# Allegro board 980K2-260817_261112-1.brd
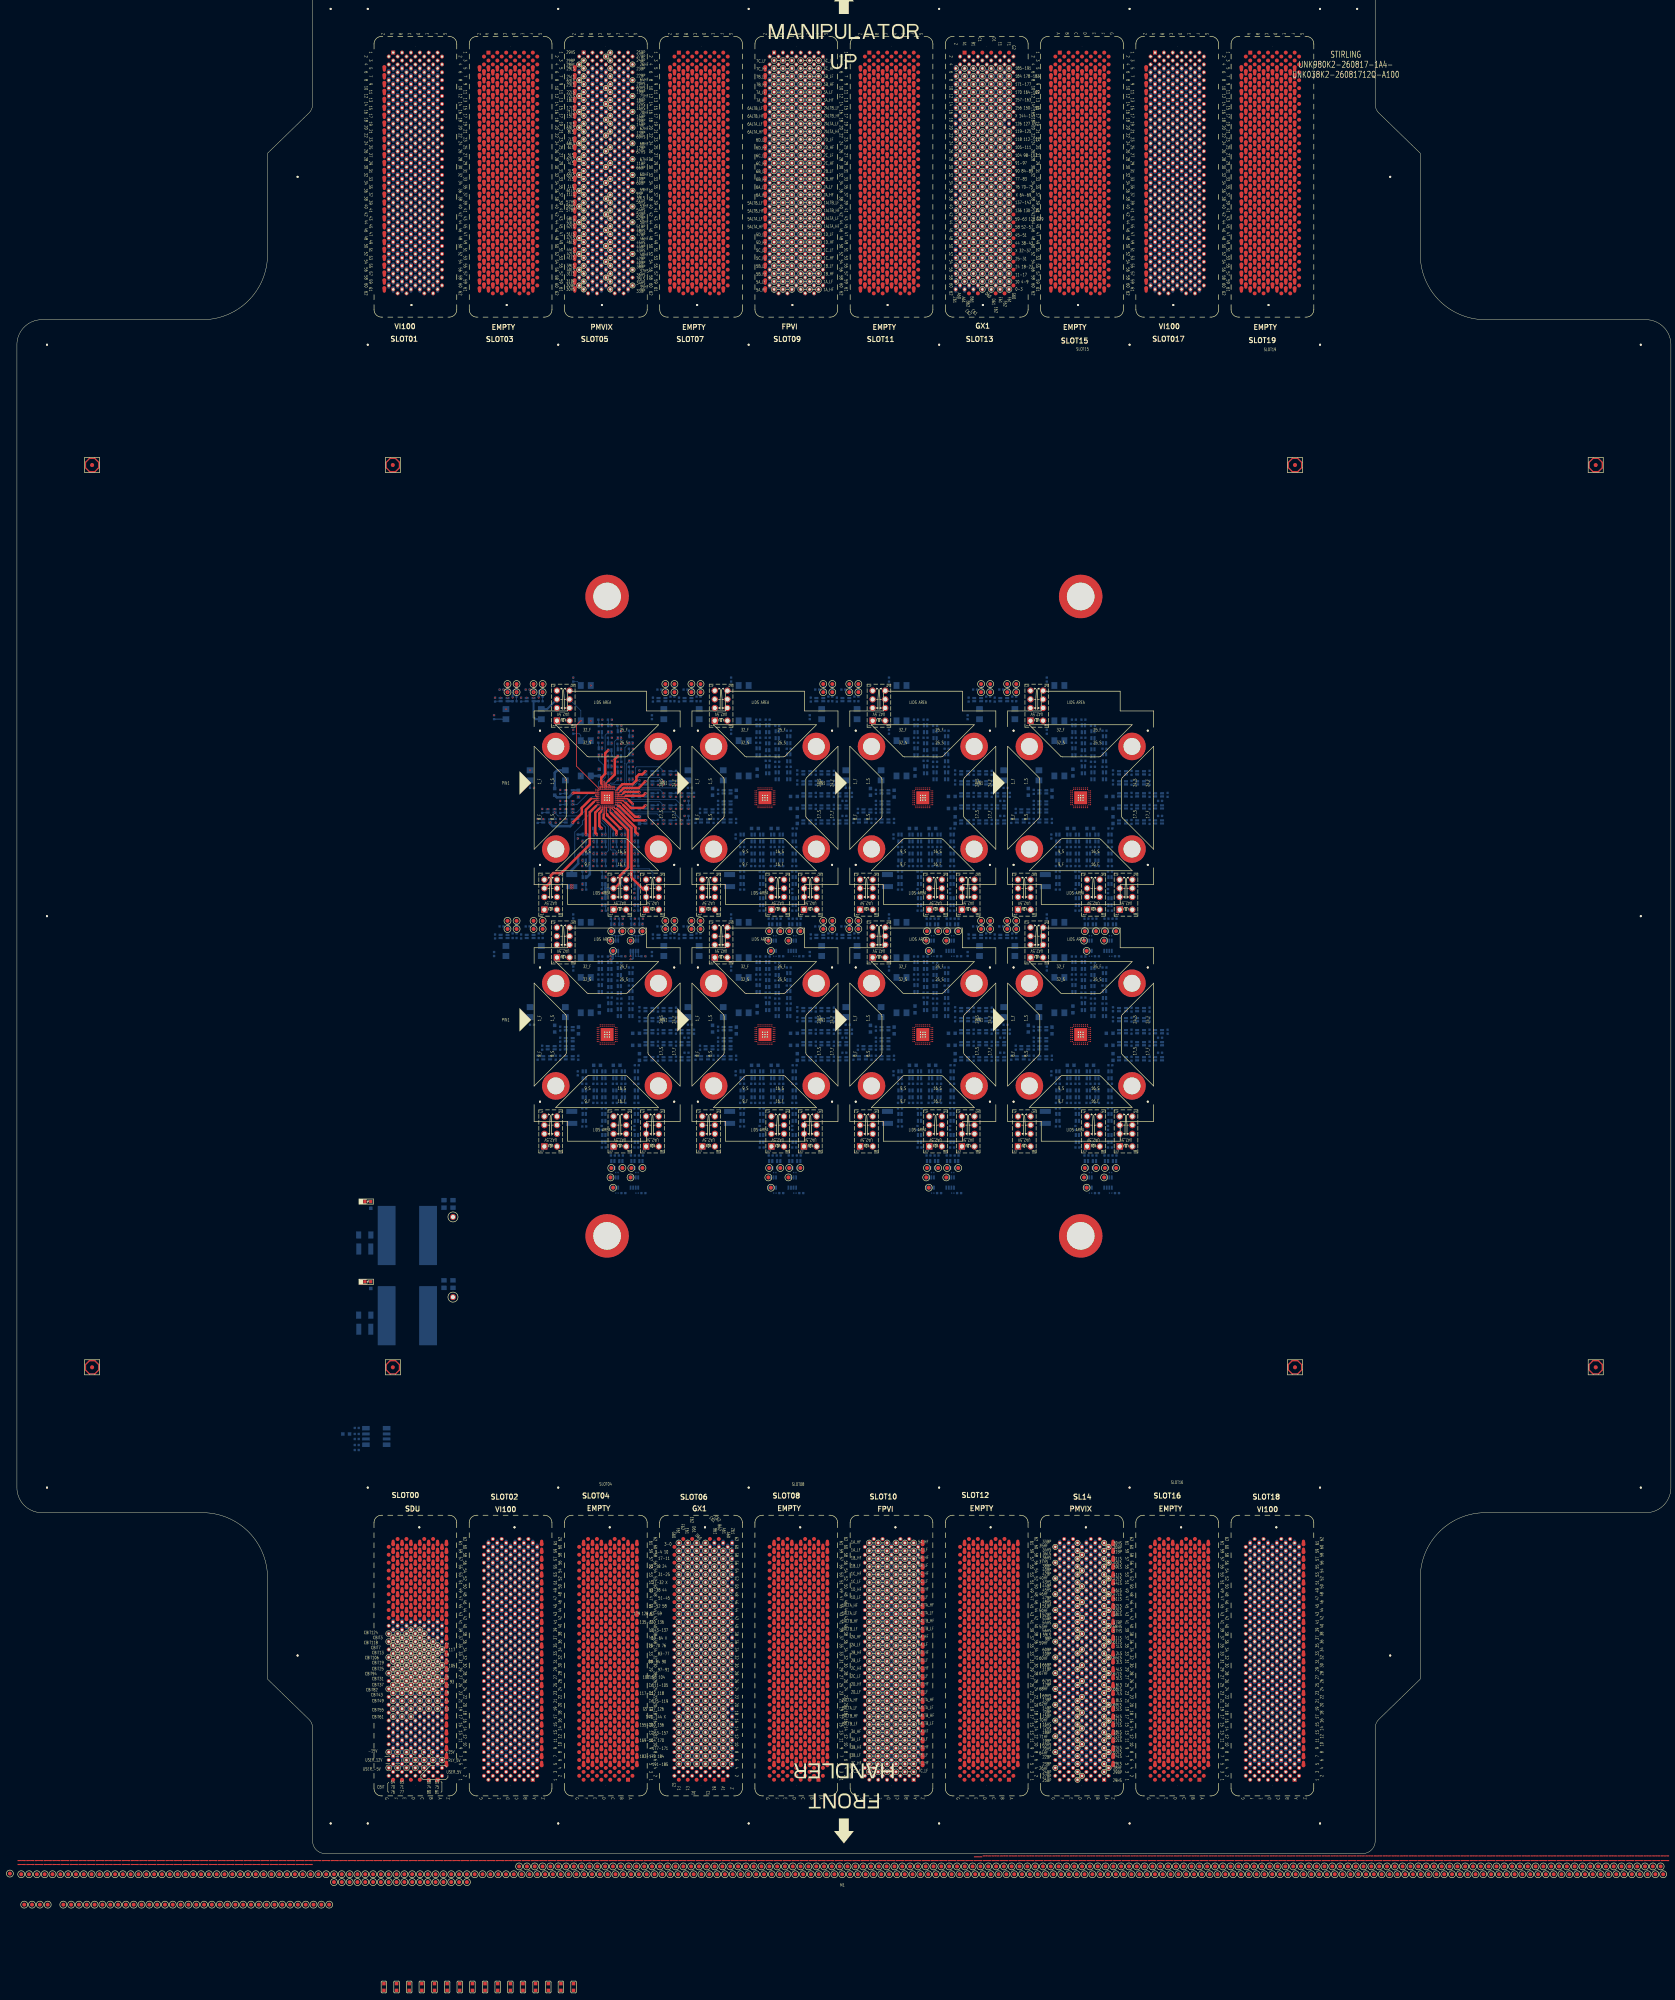
[diagram p0: board, top side]
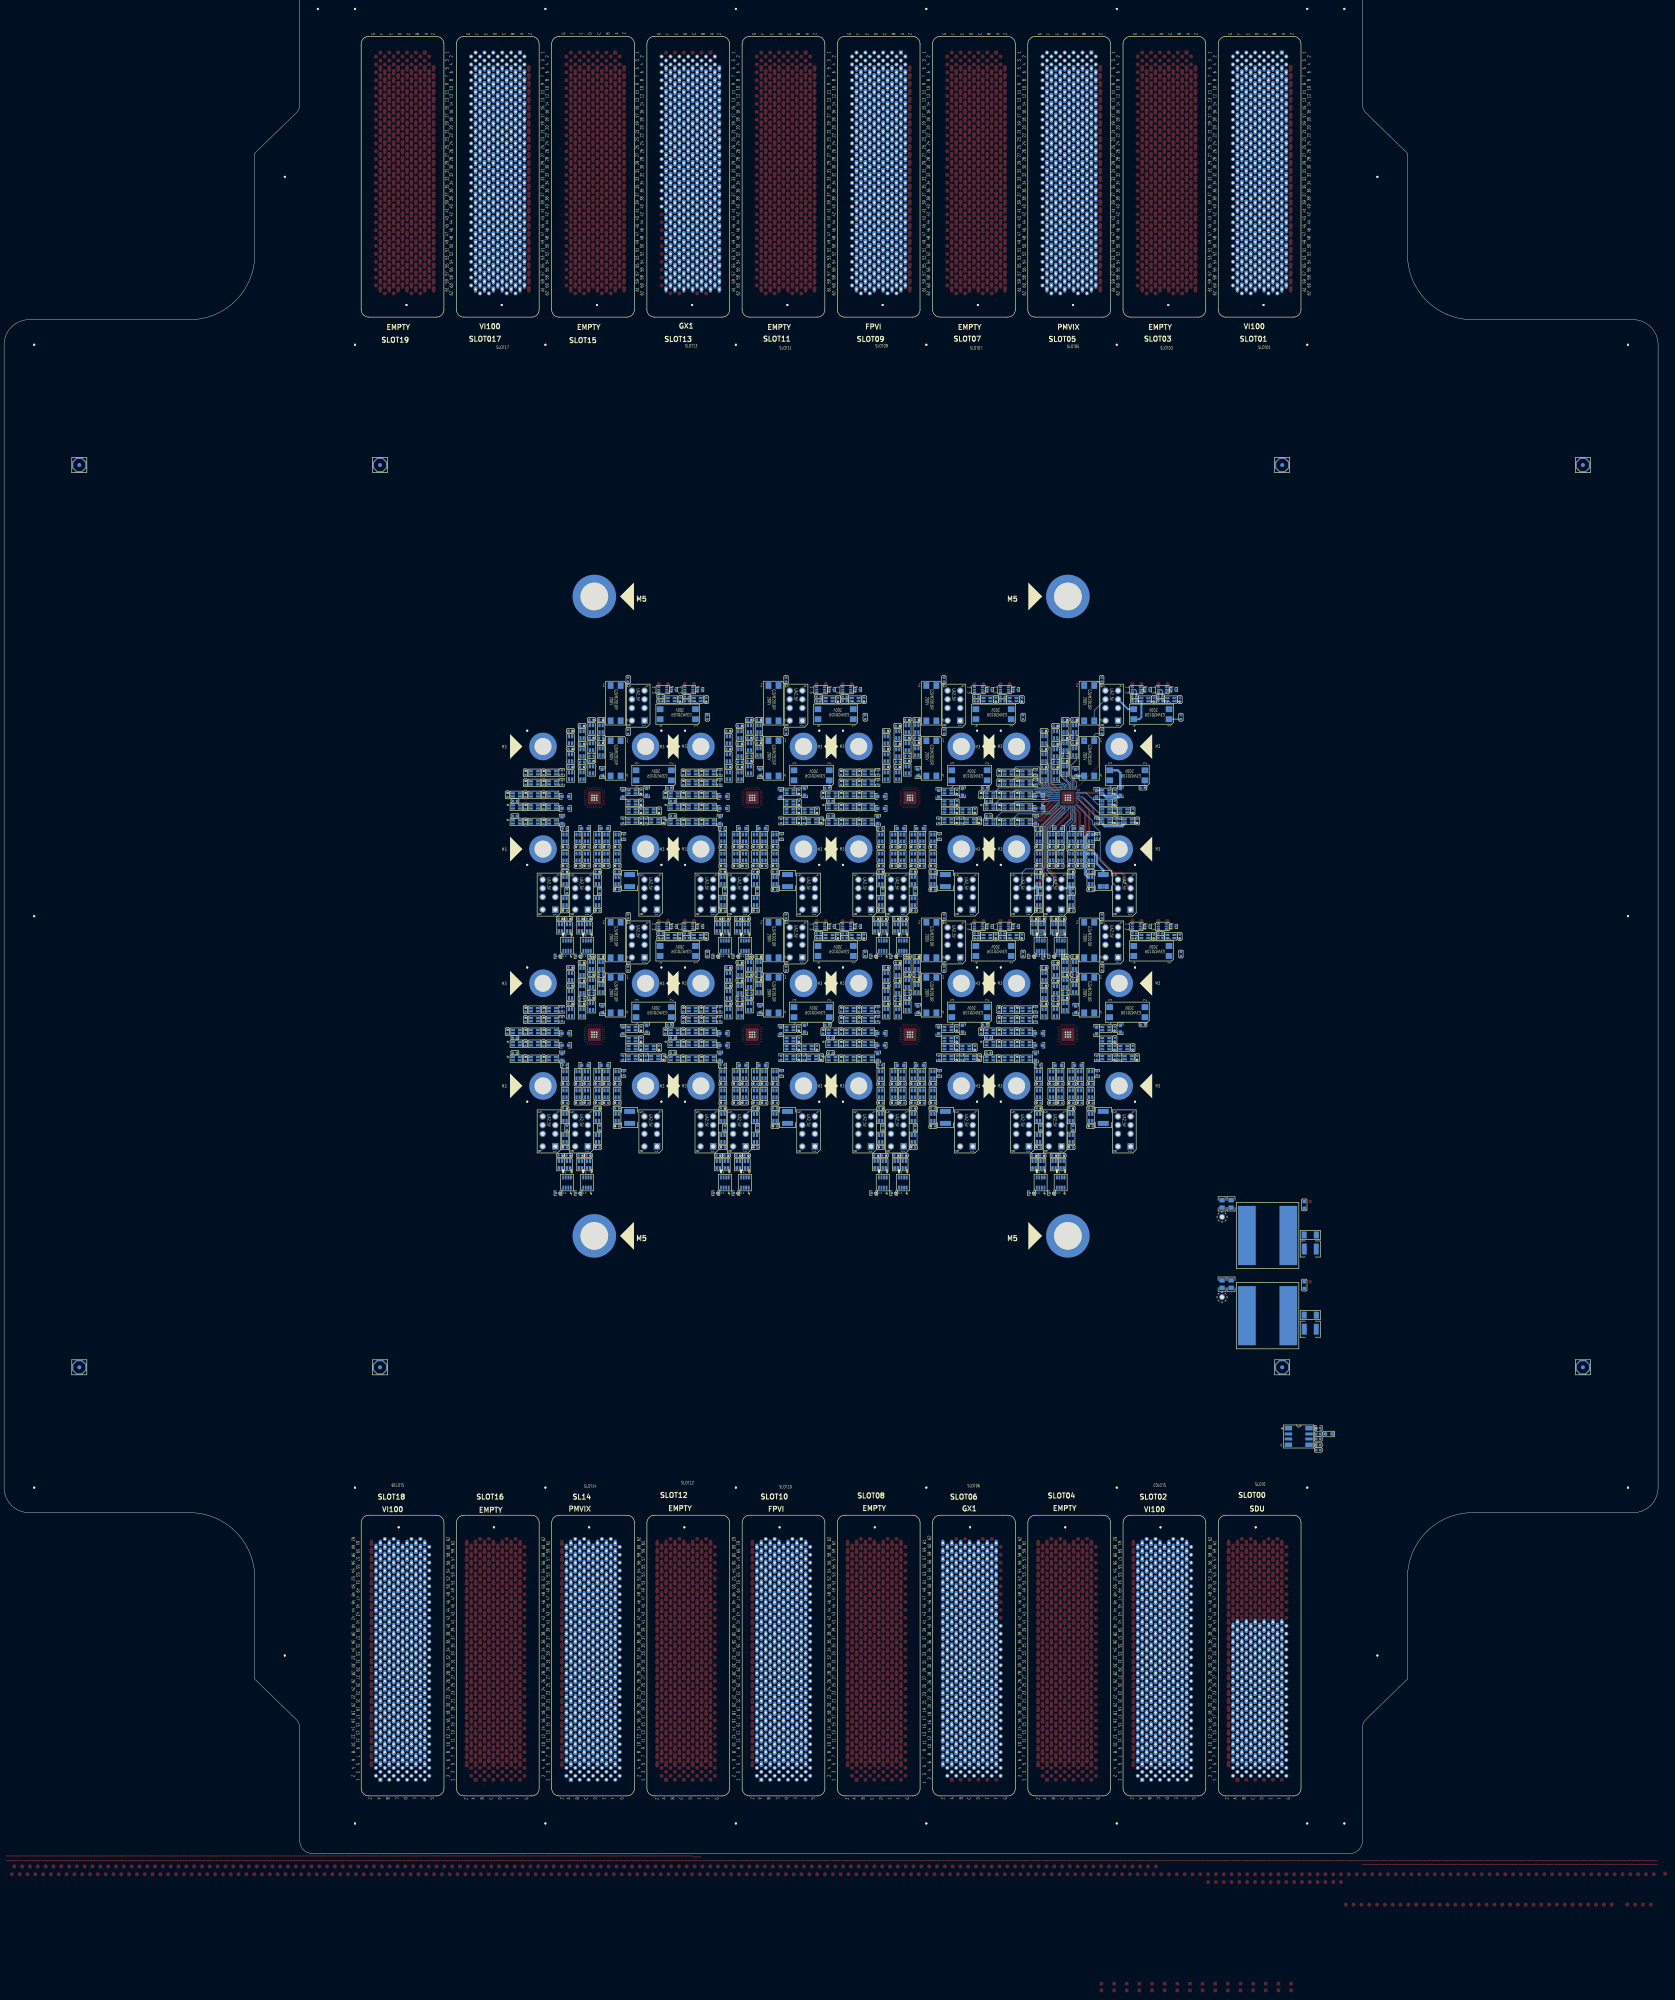
[diagram p1: board, bottom side, seen from below]

Outline 419.1 x 474.98 mm; copper layers: TOP, L02_GND, L03_DP, L04_GND, L05_DP, L06_GND, L07_VI, L08_GND, L09_VI, L10_GND, L11_VI, L12_GND, L13_VI, L14_GND, L15_5V, L16_5V, L17_C-BIT, L18_C-BIT, L19_GND, L20_VI, L21_GND, L22_VI, L23_GND, L24_VI, L25_GND, L26_VI, L27_GND, L28_DP, L29_GND, L30_DP, L31_GND, BOTTOM. Coordinates in mm from the lower left corner of the outline.

## Placement (name value [footprint] x y rotation side)
BC9  0.1U-50-X-S4-TDK  [C0402]  86.11 107.82 180 bottom
BR5  1K-1-S4  [R0402]  86.11 106.3 0 bottom
BR6  1K-1-S4  [R0402]  86.11 103.5 0 bottom
BR7  0-5-S6  [R0603]  83.44 106.3 180 bottom
BR8  0-5-S4  [R0402]  86.11 105.03 180 bottom
BR9  0-5-S4  [R0402]  86.11 102.24 180 bottom
BU1  AT24C512C-SSHM-T-SOIC8  [SO8_206X127MM]  91.06 105.66 180 bottom
C48  0.01U-100-X7R-S6-MU  [C0603]  147.57 273.87 90 bottom
C49  0.01U-100-X7R-S6-MU  [C0603]  136.27 268.99 270 bottom
C50  0.01U-100-X7R-S6-MU  [C0603]  142.28 268.54 270 bottom
C53  1U-16-X5R-S4-YA  [C0402]  142.24 261.62 270 bottom
C54  2.2U-16-X-S4-MU  [C0402]  136.53 261.62 270 bottom
C58  1U-16-X5R-S4-YA  [C0402]  142.11 257.68 270 bottom
C59  4.7U-100-X-SB-MU  [C1210]  140.59 246.51 270 bottom
C60  0.01U-100-X7R-S6-MU  [C0603]  147.01 259.72 0 bottom
C61  0.01U-100-X7R-S6-MU  [C0603]  156.88 264.78 180 bottom
C62  2.2U-16-X-S4-MU  [C0402]  157.07 259.72 0 bottom
C63  0.01U-100-X7R-S6-MU  [C0603]  157.73 261.82 90 bottom
C64  0.01U-100-X7R-S6-MU  [C0603]  156.88 267.82 180 bottom
C65  0.1U-25-X7R-S4-MU  [C0402]  157.73 271.37 90 bottom
C66  0.1U-25-X7R-S4-MU  [C0402]  152.65 276.61 180 bottom
C67  0.1U-25-X7R-S4-MU  [C0402]  150.24 278.13 180 bottom
C68  0.1U-25-X7R-S4-MU  [C0402]  147.83 282.7 180 bottom
C69  0.01U-100-X7R-S6-MU  [C0603]  151.96 259.72 0 bottom
C70  0.1U-25-X7R-S4-MU  [C0402]  122.8 294.89 180 bottom
C71  0.1U-25-X7R-S4-MU  [C0402]  129.42 294.89 180 bottom
C72  0.1U-25-X7R-S4-MU  [C0402]  158.75 227.33 0 bottom
C73  0.1U-25-X7R-S4-MU  [C0402]  153.67 227.33 0 bottom
C74  0.1U-25-X7R-S4-MU  [C0402]  157.73 273.91 90 bottom
CT1  47U-16-X5R-SB-MU  [C1210]  88.14 153.16 180 bottom
CT2  10U-16-X5R-S8-TY  [C0805]  108.2 164.59 90 bottom
CT3  22U-16-X-S8-MU  [C0805]  110.49 164.59 90 bottom
CT7  47U-16-X5R-SB-MU  [C1210]  88.14 132.84 180 bottom
CT8  10U-16-X5R-S8-TY  [C0805]  110.49 144.27 90 bottom
CT9  22U-16-X-S8-MU  [C0805]  108.2 144.27 90 bottom
F1  C1F8-0.25A-SA  [FUSE_1206_H1P05MM]  88.14 156.72 0 bottom
F2  C1F8-0.25A-SA  [FUSE_1206_H1P05MM]  88.14 136.4 0 bottom
FD1  -  [FD_040_V2]  95.25 123.19 0 top
FD2  -  [FD_040_V2]  323.85 123.19 0 top
FD3  -  [FD_040_V2]  323.85 351.79 0 top
FD4  -  [FD_040_V2]  95.25 351.79 0 top
FD5  -  [FD_040_V2]  323.85 123.19 180 bottom
FD6  -  [FD_040_V2]  95.25 123.19 180 bottom
FD7  -  [FD_040_V2]  95.25 351.79 180 bottom
FD8  -  [FD_040_V2]  323.85 351.79 180 bottom
FD9  -  [FD_040_V2]  19.05 123.19 0 top
FD10  -  [FD_040_V2]  400.05 123.19 0 top
FD11  -  [FD_040_V2]  400.05 351.79 0 top
FD12  -  [FD_040_V2]  19.05 351.79 0 top
FD13  -  [FD_040_V2]  400.05 123.19 180 bottom
FD14  -  [FD_040_V2]  19.05 123.19 180 bottom
FD15  -  [FD_040_V2]  19.05 351.79 180 bottom
FD16  -  [FD_040_V2]  400.05 351.79 180 bottom
K1  UA2-5NJ-A-V3  [RL_NECUA2_5V_V3]  138.43 290.63 270 bottom
K2  G3VM-201DR  [RL_G3VM201DR_200V]  144.15 277.5 0 bottom
K3  G3VM-201DR  [RL_G3VM201DR_200V]  134.49 273.18 90 bottom
K4  G3VM-201DR  [RL_G3VM201DR_200V]  144.15 291.47 0 bottom
K5  G3VM-51UR-5V-VSON4  [RL_G3VM_4P_VSON4]  139.95 268.99 0 bottom
K6  G3VM-51UR-5V-VSON4  [RL_G3VM_4P_VSON4]  139.95 266.19 0 bottom
K7  G3VM-51UR-5V-VSON4  [RL_G3VM_4P_VSON4]  139.95 264.16 0 bottom
K8  G3VM-51UR-5V-VSON4  [RL_G3VM_4P_VSON4]  139.95 261.62 0 bottom
K9  G3VM-51UR-5V-VSON4  [RL_G3VM_4P_VSON4]  134.24 261.62 0 bottom
K10  G3VM-51UR-5V-VSON4  [RL_G3VM_4P_VSON4]  135.38 264.16 0 bottom
K11  G3VM-51UR-5V-VSON4  [RL_G3VM_4P_VSON4]  143.76 257.3 90 bottom
K12  G3VM-51UR-5V-VSON4  [RL_G3VM_4P_VSON4]  143.76 252.48 90 bottom
K13  G3VM-51UR-5V-VSON4  [RL_G3VM_4P_VSON4]  143.76 246.51 90 bottom
K14  G3VM-51UR-5V-VSON4  [RL_G3VM_4P_VSON4]  146.56 252.48 90 bottom
K15  UA2-5NJ-A-V3  [RL_NECUA2_5V_V3]  135.25 242.75 270 bottom
K16  G3VM-51UR-5V-VSON4  [RL_G3VM_4P_VSON4]  146.56 257.3 90 bottom
K17  G3VM-51UR-5V-VSON4  [RL_G3VM_4P_VSON4]  148.72 257.3 90 bottom
K18  G3VM-51UR-5V-VSON4  [RL_G3VM_4P_VSON4]  148.72 252.48 90 bottom
K19  G3VM-51UR-5V-VSON4  [RL_G3VM_4P_VSON4]  151.51 257.3 90 bottom
K20  G3VM-51UR-5V-VSON4  [RL_G3VM_4P_VSON4]  151.51 252.48 90 bottom
K21  G3VM-51UR-5V-VSON4  [RL_G3VM_4P_VSON4]  153.67 257.3 90 bottom
K22  G3VM-51UR-5V-VSON4  [RL_G3VM_4P_VSON4]  153.67 252.48 90 bottom
K23  UA2-5NJ-A-V3  [RL_NECUA2_5V_V3]  152.78 242.75 270 bottom
K24  UA2-5NJ-A-V3  [RL_NECUA2_5V_V3]  161.04 242.75 270 bottom
K25  G3VM-51UR-5V-VSON4  [RL_G3VM_4P_VSON4]  156.97 257.3 90 bottom
K26  G3VM-51UR-5V-VSON4  [RL_G3VM_4P_VSON4]  156.97 252.48 90 bottom
K27  G3VM-51UR-5V-VSON4  [RL_G3VM_4P_VSON4]  160.15 261.37 180 bottom
K28  G3VM-51UR-5V-VSON4  [RL_G3VM_4P_VSON4]  164.72 261.37 180 bottom
K29  G3VM-51UR-5V-VSON4  [RL_G3VM_4P_VSON4]  169.29 261.37 180 bottom
K30  G3VM-51UR-5V-VSON4  [RL_G3VM_4P_VSON4]  160.15 265.18 180 bottom
K31  G3VM-51UR-5V-VSON4  [RL_G3VM_4P_VSON4]  164.72 265.18 180 bottom
K32  G3VM-51UR-5V-VSON4  [RL_G3VM_4P_VSON4]  169.29 265.18 180 bottom
K33  G3VM-51UR-5V-VSON4  [RL_G3VM_4P_VSON4]  160.15 268.22 180 bottom
K34  G3VM-51UR-5V-VSON4  [RL_G3VM_4P_VSON4]  164.72 268.22 180 bottom
K35  G3VM-51UR-5V-VSON4  [RL_G3VM_4P_VSON4]  169.29 268.22 180 bottom
K36  G3VM-51UR-5V-VSON4  [RL_G3VM_4P_VSON4]  160.15 271.27 180 bottom
K37  G3VM-51UR-5V-VSON4  [RL_G3VM_4P_VSON4]  164.72 271.27 180 bottom
K38  G3VM-51UR-5V-VSON4  [RL_G3VM_4P_VSON4]  160.15 273.81 180 bottom
K39  G3VM-51UR-5V-VSON4  [RL_G3VM_4P_VSON4]  164.72 273.81 180 bottom
K40  G3VM-51UR-5V-VSON4  [RL_G3VM_4P_VSON4]  155.58 273.05 270 bottom
K41  G3VM-51UR-5V-VSON4  [RL_G3VM_4P_VSON4]  155.58 277.62 270 bottom
K42  G3VM-51UR-5V-VSON4  [RL_G3VM_4P_VSON4]  155.58 282.19 270 bottom
K43  G3VM-51UR-5V-VSON4  [RL_G3VM_4P_VSON4]  152.65 273.05 270 bottom
K44  G3VM-51UR-5V-VSON4  [RL_G3VM_4P_VSON4]  152.65 278.89 270 bottom
K45  G3VM-51UR-5V-VSON4  [RL_G3VM_4P_VSON4]  152.65 283.46 270 bottom
K46  G3VM-51UR-5V-VSON4  [RL_G3VM_4P_VSON4]  150.24 274.57 270 bottom
K47  G3VM-51UR-5V-VSON4  [RL_G3VM_4P_VSON4]  150.24 280.42 270 bottom
K48  G3VM-51UR-5V-VSON4  [RL_G3VM_4P_VSON4]  150.24 284.99 270 bottom
K49  G3VM-51UR-5V-VSON4  [RL_G3VM_4P_VSON4]  147.83 284.99 270 bottom
K50  G3VM-51UR-5V-VSON4  [RL_G3VM_4P_VSON4]  147.83 279.15 270 bottom
K51  G3VM-51UR-5V-VSON4  [RL_G3VM_4P_VSON4]  148.72 246.51 270 bottom
K52  G3VM-51UR-5V-VSON4  [RL_G3VM_4P_VSON4]  148.72 241.17 90 bottom
K53  G3VM-51UR-5V-VSON4  [RL_G3VM_4P_VSON4]  156.97 246.51 270 bottom
K54  G3VM-51UR-5V-VSON4  [RL_G3VM_4P_VSON4]  156.97 241.17 90 bottom
K55  G3VM-51UR-5V-VSON4  [RL_G3VM_4P_VSON4]  123.44 292.35 0 bottom
K56  G3VM-201DR  [RL_G3VM201DR_200V]  128.4 288.67 90 bottom
K57  G3VM-51UR-5V-VSON4  [RL_G3VM_4P_VSON4]  158.12 234.57 270 bottom
K58  G3VM-51UR-5V-VSON4  [RL_G3VM_4P_VSON4]  156.08 234.57 270 bottom
K59  G3VM-51UR-5V-VSON4  [RL_G3VM_4P_VSON4]  153.04 234.57 270 bottom
K60  G3VM-51UR-5V-VSON4  [RL_G3VM_4P_VSON4]  151 234.57 270 bottom
K61  G3VM-51UR-5V-VSON4  [RL_G3VM_4P_VSON4]  130.05 292.35 0 bottom
LD1  LDG-2-S6  [LED_0603]  88.91 165.19 0 top
LD3  LDG-2-S6  [LED_0603]  88.91 144.87 0 top
LT1  L10U-16A-S16.5X15.5-PU  [IND_16P5X15P5MM]  98.93 156.59 0 bottom
LT3  L10U-16A-S16.5X15.5-PU  [IND_16P5X15P5MM]  98.93 136.27 0 bottom
M1  PG_LTXDX_F_X1_OUTLINE_TD_V2  [PG_LTXDX_F_X1_OUTLINE_TD_COHU]  209.55 237.49 0 top
NOREF  -  []  273.18 217.69 90 top
NOREF#2  -  []  237.71 233.69 90 top
NOREF#3  -  []  223.89 185.24 90 top
NOREF#4  -  []  151.7 285.06 90 top
NOREF#5  -  []  276.7 193.03 90 top
NOREF#6  -  []  157.03 178.07 0 top
NOREF#7  -  []  154.86 454.29 90 top
NOREF#8  -  []  261.55 267.14 90 top
NOREF#9  -  []  273.76 255.7 90 top
NOREF#10  -  []  264.16 256.43 90 top
NOREF#11  -  []  228.81 190.88 90 top
NOREF#12  -  []  221.85 292.49 0 top
NOREF#13  -  []  132.26 237.5 0 top
NOREF#14  -  []  277.71 173.69 0 top
NOREF#15  -  []  231.46 227 0 top
NOREF#16  -  []  188.78 184.35 0 top
NOREF#17  -  []  143.49 247.06 90 top
NOREF#18  -  []  218.35 264.47 0 top
NOREF#19  -  []  151.11 200.17 90 top
NOREF#20  -  []  206.32 266.13 0 top
NOREF#21  -  []  189.24 185.31 90 top
NOREF#22  -  []  264.16 245.63 90 top
NOREF#23  -  []  217.29 187.78 0 top
NOREF#24  -  []  231.79 256.75 0 top
NOREF#25  -  []  237.18 176.17 90 top
NOREF#26  -  []  259.73 178.35 0 top
NOREF#27  -  []  231.73 172.54 0 top
NOREF#28  -  []  205.74 14.59 90 top
NOREF#29  -  []  135.43 276.18 0 top
NOREF#30  -  []  213.62 229.09 90 top
NOREF#31  -  []  239.27 270.87 90 top
NOREF#32  -  []  235.68 233.69 90 top
NOREF#33  -  []  288.42 265.58 0 top
NOREF#34  -  []  135.82 266.44 0 top
NOREF#35  -  []  172.55 190.49 90 top
NOREF#36  -  []  173.34 17.15 90 top
NOREF#37  -  []  258.95 204.09 0 top
NOREF#38  -  []  259.73 238.35 0 top
NOREF#39  -  []  262.87 286.99 0 top
NOREF#40  -  []  273.83 232.21 90 top
NOREF#41  -  []  254.38 264.09 0 top
NOREF#42  -  []  149.29 276.17 90 top
NOREF#43  -  []  154.07 251.6 90 top
NOREF#44  -  []  193.18 271.85 90 top
NOREF#45  -  []  157.25 196.75 0 top
NOREF#46  -  []  229.72 286.19 0 top
NOREF#47  -  []  284.95 212.86 90 top
NOREF#48  -  []  189.84 219.54 0 top
NOREF#49  -  []  228.32 182.05 0 top
NOREF#50  -  []  274.39 286.59 90 top
NOREF#51  -  []  312.52 456.29 90 top
NOREF#52  -  []  235.27 458.49 0 top
NOREF#53  -  []  233.18 217.69 90 top
NOREF#54  -  []  283.84 268.62 0 top
NOREF#55  -  []  186.16 200.17 90 top
NOREF#56  -  []  284.64 181.15 90 top
NOREF#57  -  []  228.32 242.05 0 top
NOREF#58  -  []  219.08 263.76 0 top
NOREF#59  -  []  190.15 206.89 90 top
NOREF#60  -  []  268.32 185.63 90 top
NOREF#61  -  []  275.92 195.7 90 top
NOREF#62  -  []  213.64 239.09 0 top
NOREF#63  -  []  142.88 286.99 0 top
NOREF#64  -  []  218.35 271.84 0 top
NOREF#65  -  []  144.16 256.43 90 top
NOREF#66  -  []  184.16 185.63 90 top
NOREF#67  -  []  203.84 261.77 0 top
NOREF#68  -  []  196.8 274.65 90 top
NOREF#69  -  []  188.99 240.62 0 top
NOREF#70  -  []  147.45 269.24 0 top
NOREF#71  -  []  190.88 228.6 90 top
NOREF#72  -  []  283.97 213.09 90 top
NOREF#73  -  []  265.42 274.72 90 top
NOREF#74  -  []  243.84 264.78 90 top
NOREF#75  -  []  210.89 266.13 0 top
NOREF#76  -  []  283.84 213.41 90 top
NOREF#77  -  []  152.13 274.25 0 top
NOREF#78  -  []  173.64 299.09 0 top
NOREF#79  -  []  270.6 173.69 0 top
NOREF#80  -  []  259.08 265.79 0 top
NOREF#81  -  []  227.8 209.99 0 top
NOREF#82  -  []  174.09 200.42 90 top
NOREF#83  -  []  228.32 258.18 0 top
NOREF#84  -  []  152.72 252.5 0 top
NOREF#85  -  []  144.04 251.93 0 top
NOREF#86  -  []  227.77 192.78 0 top
NOREF#87  -  []  253.78 267.01 0 top
NOREF#88  -  []  152.11 231.4 0 top
NOREF#89  -  []  266.28 197.85 90 top
NOREF#90  -  []  181.03 207.69 90 top
NOREF#91  -  []  230.97 239.57 90 top
NOREF#92  -  []  156.84 227.33 0 top
NOREF#93  -  []  272.13 274.25 0 top
NOREF#94  -  []  271.53 233.37 90 top
NOREF#95  -  []  167.74 456.29 0 top
NOREF#96  -  []  290.89 266.13 0 top
NOREF#97  -  []  101.95 82.65 0 top
NOREF#98  -  []  199.27 201.77 0 top
NOREF#99  -  []  261.85 306.46 0 top
NOREF#100  -  []  265.41 286.99 90 top
NOREF#101  -  []  209.55 237.49 90 top
NOREF#102  -  []  189.12 251.6 90 top
NOREF#103  -  []  264.04 251.93 0 top
NOREF#104  -  []  175.65 184.35 0 top
NOREF#105  -  []  184.16 256.43 90 top
NOREF#106  -  []  236.57 245.63 90 top
NOREF#107  -  []  193.76 190.88 90 top
NOREF#108  -  []  231.98 286.59 90 top
NOREF#109  -  []  251.65 233.3 90 top
NOREF#110  -  []  268.44 257.85 90 top
NOREF#111  -  []  197.37 180.3 90 top
NOREF#112  -  []  174.43 292.23 0 top
NOREF#113  -  []  140.83 265.79 90 top
NOREF#114  -  []  211.21 234.89 90 top
NOREF#115  -  []  151.7 283.69 0 top
NOREF#116  -  []  198.47 82.65 0 top
NOREF#117  -  []  227.9 265.84 90 top
NOREF#118  -  []  174.43 232.23 0 top
NOREF#119  -  []  187.99 238.35 0 top
NOREF#120  -  []  271.91 191.6 90 top
NOREF#121  -  []  244.95 270.32 90 top
NOREF#122  -  []  212.55 224.49 0 top
NOREF#123  -  []  154.78 176.5 90 top
NOREF#124  -  []  204.95 200.42 90 top
NOREF#125  -  []  254.51 203.76 0 top
NOREF#126  -  []  163.97 274.54 0 top
NOREF#127  -  []  253.64 239.09 0 top
NOREF#128  -  []  154.62 252.5 90 top
NOREF#129  -  []  175.02 268.14 90 top
NOREF#130  -  []  193.03 232.1 0 top
NOREF#131  -  []  192.11 231.4 0 top
NOREF#132  -  []  239.4 265.9 0 top
NOREF#133  -  []  243.84 260.97 90 top
NOREF#134  -  []  262.81 246.81 0 top
NOREF#135  -  []  252.64 264.47 0 top
NOREF#136  -  []  191.19 218.07 0 top
NOREF#137  -  []  191.53 233.37 90 top
NOREF#138  -  []  163.84 274.21 0 top
NOREF#139  -  []  157.71 173.69 0 top
NOREF#140  -  []  229.12 240.3 90 top
NOREF#141  -  []  129.36 361.96 0 top
NOREF#142  -  []  258.35 211.84 0 top
NOREF#143  -  []  179.73 178.35 0 top
NOREF#144  -  []  261.55 209.94 90 top
NOREF#145  -  []  159.27 210.87 90 top
NOREF#146  -  []  239.27 204.78 90 top
NOREF#147  -  []  191.19 223.92 0 top
NOREF#148  -  []  136.55 194.49 90 top
NOREF#149  -  []  169.52 200.42 90 top
NOREF#150  -  []  189.72 215.77 0 top
NOREF#151  -  []  210.92 231.95 90 top
NOREF#152  -  []  147.3 220.35 0 top
NOREF#153  -  []  260.83 261.22 90 top
NOREF#154  -  []  254 14.59 90 top
NOREF#155  -  []  186.96 196.43 90 top
NOREF#156  -  []  153.83 172.21 90 top
NOREF#157  -  []  196.57 242.05 0 top
NOREF#158  -  []  224.04 196.75 0 top
NOREF#159  -  []  277.18 176.17 90 top
NOREF#160  -  []  275.05 278.82 0 top
NOREF#161  -  []  204.44 292.28 90 top
NOREF#162  -  []  139.72 273.6 90 top
NOREF#163  -  []  269.84 279.54 90 top
NOREF#164  -  []  229.67 190.01 0 top
NOREF#165  -  []  188.78 244.35 0 top
NOREF#166  -  []  272.63 173.69 0 top
NOREF#167  -  []  154.33 264.33 90 top
NOREF#168  -  []  187.43 224.11 0 top
NOREF#169  -  []  204.95 272.86 90 top
NOREF#170  -  []  236.52 216.55 0 top
NOREF#171  -  []  228.32 193.35 0 top
NOREF#172  -  []  273.94 191.93 0 top
NOREF#173  -  []  242.57 231.95 0 top
NOREF#174  -  []  145.42 213.02 90 top
NOREF#175  -  []  155.17 272.17 0 top
NOREF#176  -  []  187.43 278.27 0 top
NOREF#177  -  []  272.13 214.25 0 top
NOREF#178  -  []  157.03 238.07 0 top
NOREF#179  -  []  144.16 196.43 90 top
NOREF#180  -  []  191.91 256.43 90 top
NOREF#181  -  []  203.97 274.54 0 top
NOREF#182  -  []  242.26 236.17 90 top
NOREF#183  -  []  173.65 239.15 0 top
NOREF#184  -  []  279.22 239.57 90 top
NOREF#185  -  []  168.54 200.64 90 top
NOREF#186  -  []  235.68 173.69 0 top
NOREF#187  -  []  89.74 135.6 90 top
NOREF#188  -  []  169.52 267.27 90 top
NOREF#189  -  []  155.92 195.7 90 top
NOREF#190  -  []  201.75 272.22 0 top
NOREF#191  -  []  167.74 456.29 90 top
NOREF#192  -  []  234.39 222.02 90 top
NOREF#193  -  []  156.57 198.18 0 top
NOREF#194  -  []  186.01 195.7 90 top
NOREF#195  -  []  135.66 184.35 0 top
NOREF#196  -  []  194.39 222.02 90 top
NOREF#197  -  []  151.19 223.92 0 top
NOREF#198  -  []  88.44 107.76 0 top
NOREF#199  -  []  204.61 294.24 90 top
NOREF#200  -  []  203.97 204.45 90 top
NOREF#201  -  []  264.26 456.29 0 top
NOREF#202  -  []  208.54 268.95 0 top
NOREF#203  -  []  238.91 232.21 90 top
NOREF#204  -  []  197.71 173.69 0 top
NOREF#205  -  []  236.02 181.47 0 top
NOREF#206  -  []  260.83 201.22 90 top
NOREF#207  -  []  173.36 201.22 0 top
NOREF#208  -  []  277.74 166.36 90 top
NOREF#209  -  []  203.97 273.09 90 top
NOREF#210  -  []  214.51 203.76 0 top
NOREF#211  -  []  163.97 210.55 90 top
NOREF#212  -  []  267.45 209.24 0 top
NOREF#213  -  []  155.17 216.75 0 top
NOREF#214  -  []  283.97 268.95 0 top
NOREF#215  -  []  189.84 213.7 90 top
NOREF#216  -  []  195.05 223.39 0 top
NOREF#217  -  []  152.63 232.86 0 top
NOREF#218  -  []  192.25 218.02 0 top
NOREF#219  -  []  227.43 224.11 0 top
NOREF#220  -  []  206.32 262.32 0 top
NOREF#221  -  []  187.3 286.19 0 top
NOREF#222  -  []  238.11 172.1 0 top
NOREF#223  -  []  149.56 259.27 90 top
NOREF#224  -  []  236.7 257.85 90 top
NOREF#225  -  []  204.95 270.32 90 top
NOREF#226  -  []  184.04 191.93 0 top
NOREF#227  -  []  147.8 209.99 0 top
NOREF#228  -  []  260.95 261.55 90 top
NOREF#229  -  []  281.44 184.35 0 top
NOREF#230  -  []  203.84 264.78 90 top
NOREF#231  -  []  249.52 270.32 90 top
NOREF#232  -  []  152.72 197.6 0 top
NOREF#233  -  []  265.41 273.02 90 top
NOREF#234  -  []  138.95 266.12 0 top
NOREF#235  -  []  266.43 282.49 90 top
NOREF#236  -  []  248.42 267.82 90 top
NOREF#237  -  []  156.81 172.54 0 top
NOREF#238  -  []  226.7 297.01 90 top
NOREF#239  -  []  133.78 207.01 0 top
NOREF#240  -  []  206.32 202.32 0 top
NOREF#241  -  []  235.56 175.77 0 top
NOREF#242  -  []  231.11 258.18 0 top
NOREF#243  -  []  156.61 173.37 90 top
NOREF#244  -  []  176.55 194.49 90 top
NOREF#245  -  []  241.75 209.17 0 top
NOREF#246  -  []  130.92 231.95 90 top
NOREF#247  -  []  180.59 184.98 90 top
NOREF#248  -  []  284.95 207.27 90 top
NOREF#249  -  []  197.03 178.07 0 top
NOREF#250  -  []  146.28 193.03 90 top
NOREF#251  -  []  157.71 233.69 90 top
NOREF#252  -  []  227.23 18.69 90 top
NOREF#253  -  []  231.71 171.3 0 top
NOREF#254  -  []  259.55 294.49 0 top
NOREF#255  -  []  204.95 212.86 90 top
NOREF#256  -  []  232.66 166.36 90 top
NOREF#257  -  []  191.76 167.33 0 top
NOREF#258  -  []  256.26 263.76 90 top
NOREF#259  -  []  188.81 195.7 90 top
NOREF#260  -  []  228.78 244.35 0 top
NOREF#261  -  []  149.12 196.43 90 top
NOREF#262  -  []  211.65 293.3 90 top
NOREF#263  -  []  173.65 179.15 0 top
NOREF#264  -  []  157.37 256.43 90 top
NOREF#265  -  []  271.91 196.43 90 top
NOREF#266  -  []  267.77 252.78 0 top
NOREF#267  -  []  248.54 200.64 90 top
NOREF#268  -  []  137.28 286.47 90 top
NOREF#269  -  []  143.49 187.06 90 top
NOREF#270  -  []  279.4 264.45 90 top
NOREF#271  -  []  206.32 209.17 0 top
NOREF#272  -  []  278.13 389.27 90 top
NOREF#273  -  []  163.97 265.9 0 top
NOREF#274  -  []  155.17 276.75 0 top
NOREF#275  -  []  185.41 226.99 90 top
NOREF#276  -  []  148.32 245.63 0 top
NOREF#277  -  []  148.78 222.65 0 top
NOREF#278  -  []  252.87 227.4 90 top
NOREF#279  -  []  153.18 211.85 90 top
NOREF#280  -  []  194.78 236.5 90 top
NOREF#281  -  []  219.08 261.22 0 top
NOREF#282  -  []  156.81 232.54 0 top
NOREF#283  -  []  236.02 197.6 0 top
NOREF#284  -  []  240.11 18.69 0 top
NOREF#285  -  []  204.95 267.27 90 top
NOREF#286  -  []  204.61 234.89 90 top
NOREF#287  -  []  133.68 389.27 90 top
NOREF#288  -  []  244.64 241.15 90 top
NOREF#289  -  []  178.95 206.12 0 top
NOREF#290  -  []  248.42 200.97 90 top
NOREF#291  -  []  170.92 231.95 90 top
NOREF#292  -  []  266.01 195.7 90 top
NOREF#293  -  []  144.16 251.6 90 top
NOREF#294  -  []  236.02 192.78 0 top
NOREF#295  -  []  174.04 210.63 90 top
NOREF#296  -  []  247.98 286.38 90 top
NOREF#297  -  []  146.01 190.88 90 top
NOREF#298  -  []  190.97 179.57 90 top
NOREF#299  -  []  164.04 237.5 90 top
NOREF#300  -  []  178.95 264.09 0 top
NOREF#301  -  []  233.39 197.85 90 top
NOREF#302  -  []  134.43 292.23 0 top
NOREF#303  -  []  267.77 197.6 0 top
NOREF#304  -  []  86.61 153.16 0 top
NOREF#305  -  []  241.75 262.32 0 top
NOREF#306  -  []  270.77 223.79 90 top
NOREF#307  -  []  254.51 263.76 0 top
NOREF#308  -  []  150.88 168.6 90 top
NOREF#309  -  []  152.66 166.36 90 top
NOREF#310  -  []  268.99 251.93 0 top
NOREF#311  -  []  219.73 238.35 0 top
NOREF#312  -  []  134.38 264.09 0 top
NOREF#313  -  []  288.54 205.9 0 top
NOREF#314  -  []  197.47 17.15 0 top
NOREF#315  -  []  196.7 193.03 90 top
NOREF#316  -  []  201.75 274.76 0 top
NOREF#317  -  []  239.4 264.45 90 top
NOREF#318  -  []  204.32 291.95 90 top
NOREF#319  -  []  270.56 192.78 0 top
NOREF#320  -  []  199.4 267.5 90 top
NOREF#321  -  []  189.24 245.31 90 top
NOREF#322  -  []  225.41 273.02 90 top
NOREF#323  -  []  270.6 173.69 90 top
NOREF#324  -  []  235.17 216.75 90 top
NOREF#325  -  []  228.78 288.49 0 top
NOREF#326  -  []  169.52 212.86 90 top
NOREF#327  -  []  208.54 205.9 0 top
NOREF#328  -  []  307.66 457.2 0 top
NOREF#329  -  []  228.99 180.62 0 top
NOREF#330  -  []  267.8 264.99 90 top
NOREF#331  -  []  195.56 235.77 0 top
NOREF#332  -  []  211.65 233.3 90 top
NOREF#333  -  []  262.81 252.78 0 top
NOREF#334  -  []  190.98 184.35 0 top
NOREF#335  -  []  138.95 201.55 0 top
NOREF#336  -  []  268.32 182.05 0 top
NOREF#337  -  []  220.95 268.91 90 top
NOREF#338  -  []  196.8 280.49 90 top
NOREF#339  -  []  266.16 198.18 0 top
NOREF#340  -  []  199.27 273.41 90 top
NOREF#341  -  []  263.36 187.38 0 top
NOREF#342  -  []  189.72 286.19 0 top
NOREF#343  -  []  188.78 228.49 0 top
NOREF#344  -  []  239.4 274.54 0 top
NOREF#345  -  []  271.98 280.75 90 top
NOREF#346  -  []  230.6 233.69 90 top
NOREF#347  -  []  268.78 244.35 0 top
NOREF#348  -  []  271.76 227.33 0 top
NOREF#349  -  []  227.3 220.35 0 top
NOREF#350  -  []  157.28 264.37 0 top
NOREF#351  -  []  188.78 282.65 0 top
NOREF#352  -  []  132.26 248.4 0 top
NOREF#353  -  []  178.95 268.91 0 top
NOREF#354  -  []  209.55 237.49 90 top
NOREF#355  -  []  283.97 264.45 90 top
NOREF#356  -  []  188.32 245.63 0 top
NOREF#357  -  []  203.4 296.38 0 top
NOREF#358  -  []  277.74 226.35 90 top
NOREF#359  -  []  248.94 221.73 0 top
NOREF#360  -  []  279.24 184.35 0 top
NOREF#361  -  []  197.04 184.35 0 top
NOREF#362  -  []  176.98 205.11 90 top
NOREF#363  -  []  237.04 184.35 0 top
NOREF#364  -  []  156.02 181.47 0 top
NOREF#365  -  []  181.55 262.57 90 top
NOREF#366  -  []  164.64 241.15 90 top
NOREF#367  -  []  218.95 261.55 0 top
NOREF#368  -  []  276.52 276.55 0 top
NOREF#369  -  []  226.16 193.35 0 top
NOREF#370  -  []  176.55 254.49 90 top
NOREF#371  -  []  139.49 266.31 90 top
NOREF#372  -  []  135.15 260.67 90 top
NOREF#373  -  []  139.08 261.22 0 top
NOREF#374  -  []  193.18 244.35 0 top
NOREF#375  -  []  188.32 182.05 0 top
NOREF#376  -  []  90.48 16.49 0 top
NOREF#377  -  []  85.84 137.3 0 top
NOREF#378  -  []  254.04 270.63 90 top
NOREF#379  -  []  207.95 286.12 90 top
NOREF#380  -  []  147.3 286.19 0 top
NOREF#381  -  []  192.25 278.02 0 top
NOREF#382  -  []  147.8 265.39 90 top
NOREF#383  -  []  154.63 274.65 90 top
NOREF#384  -  []  236.33 167.9 90 top
NOREF#385  -  []  279.4 212 0 top
NOREF#386  -  []  281.75 269.17 0 top
NOREF#387  -  []  242.85 297.22 0 top
NOREF#388  -  []  168.54 262.09 0 top
NOREF#389  -  []  237.04 244.35 0 top
NOREF#390  -  []  229.84 284.11 90 top
NOREF#391  -  []  245.38 286.23 0 top
NOREF#392  -  []  168.54 265.9 0 top
NOREF#393  -  []  197.25 240.62 0 top
NOREF#394  -  []  155.56 235.77 0 top
NOREF#395  -  []  166.32 262.32 0 top
NOREF#396  -  []  188.81 190.88 90 top
NOREF#397  -  []  138.35 211.84 0 top
NOREF#398  -  []  193.6 226.96 0 top
NOREF#399  -  []  261.55 202.57 90 top
NOREF#400  -  []  213.78 267.01 0 top
NOREF#401  -  []  196.7 241.72 90 top
NOREF#402  -  []  209.52 207.27 90 top
NOREF#403  -  []  226.96 256.43 90 top
NOREF#404  -  []  165.49 452.29 90 top
NOREF#405  -  []  142.88 273.02 0 top
NOREF#406  -  []  178.95 204.09 0 top
NOREF#407  -  []  109.55 389.27 90 top
NOREF#408  -  []  131.05 229.49 0 top
NOREF#409  -  []  239.4 202.09 0 top
NOREF#410  -  []  137.29 187.78 0 top
NOREF#411  -  []  149.55 188.99 90 top
NOREF#412  -  []  178.85 241.15 90 top
NOREF#413  -  []  159.06 178.07 0 top
NOREF#414  -  []  142.81 197.6 0 top
NOREF#415  -  []  180.83 205.79 90 top
NOREF#416  -  []  168.42 265.58 0 top
NOREF#417  -  []  178.97 211.91 90 top
NOREF#418  -  []  258.97 211.91 90 top
NOREF#419  -  []  268.19 247.71 0 top
NOREF#420  -  []  254.43 292.23 0 top
NOREF#421  -  []  157.92 190.01 0 top
NOREF#422  -  []  168.94 281.73 0 top
NOREF#423  -  []  312.5 18.69 90 top
NOREF#424  -  []  182.03 229.03 90 top
NOREF#425  -  []  163.97 264.45 90 top
NOREF#426  -  []  204.95 264.23 90 top
NOREF#427  -  []  231.19 288.49 0 top
NOREF#428  -  []  191.95 238.07 0 top
NOREF#429  -  []  182.87 273.02 0 top
NOREF#430  -  []  213.36 201.22 0 top
NOREF#431  -  []  249.52 212.86 90 top
NOREF#432  -  []  255.84 202.57 90 top
NOREF#433  -  []  148.24 392.33 90 top
NOREF#434  -  []  174.38 264.09 0 top
NOREF#435  -  []  162.85 237.22 0 top
NOREF#436  -  []  139.08 265.79 0 top
NOREF#437  -  []  229.12 251.6 90 top
NOREF#438  -  []  170.02 274.45 0 top
NOREF#439  -  []  266.01 184.91 90 top
NOREF#440  -  []  256.26 203.76 90 top
NOREF#441  -  []  230.6 173.69 0 top
NOREF#442  -  []  170.89 202.32 0 top
NOREF#443  -  []  171.05 289.49 0 top
NOREF#444  -  []  229.55 188.99 90 top
NOREF#445  -  []  203.84 270.87 90 top
NOREF#446  -  []  168.54 267.5 90 top
NOREF#447  -  []  199.4 207.5 90 top
NOREF#448  -  []  267.9 205.84 90 top
NOREF#449  -  []  239.27 214.21 0 top
NOREF#450  -  []  152.13 284.66 0 top
NOREF#451  -  []  193.56 173.37 90 top
NOREF#452  -  []  229.12 196.43 90 top
NOREF#453  -  []  192.13 224.66 0 top
NOREF#454  -  []  249.52 267.27 90 top
NOREF#455  -  []  123.4 281.8 0 top
NOREF#456  -  []  144.71 241.71 90 top
NOREF#457  -  []  216.83 227.03 0 top
NOREF#458  -  []  196.33 227.9 90 top
NOREF#459  -  []  148.95 266.89 0 top
NOREF#460  -  []  254.09 204.23 90 top
NOREF#461  -  []  129.05 232.28 0 top
NOREF#462  -  []  195.05 278.82 0 top
NOREF#463  -  []  224.16 185.63 90 top
NOREF#464  -  []  286.32 206.13 0 top
NOREF#465  -  []  236.57 198.18 0 top
NOREF#466  -  []  279.4 262.09 0 top
NOREF#467  -  []  209.05 232.28 0 top
NOREF#468  -  []  193.18 277.69 90 top
NOREF#469  -  []  232.25 222.59 90 top
NOREF#470  -  []  151.19 228.49 0 top
NOREF#471  -  []  184.04 245.96 0 top
NOREF#472  -  []  263.36 253.35 0 top
NOREF#473  -  []  195.56 175.77 0 top
NOREF#474  -  []  307.65 17.78 0 top
NOREF#475  -  []  216.55 280.49 0 top
NOREF#476  -  []  239.4 200.64 90 top
NOREF#477  -  []  192.63 233.69 90 top
NOREF#478  -  []  150.6 173.69 0 top
NOREF#479  -  []  241.75 214.76 0 top
NOREF#480  -  []  276.8 285.06 90 top
NOREF#481  -  []  239.72 219.22 90 top
NOREF#482  -  []  133.24 201.55 0 top
NOREF#483  -  []  130.02 214.45 0 top
NOREF#484  -  []  178.35 211.84 0 top
NOREF#485  -  []  136.55 280.49 0 top
NOREF#486  -  []  163.97 268.95 0 top
NOREF#487  -  []  267.99 178.35 0 top
NOREF#488  -  []  178.95 261.55 0 top
NOREF#489  -  []  159.27 264.78 90 top
NOREF#490  -  []  266.16 258.18 0 top
NOREF#491  -  []  157.18 236.17 90 top
NOREF#492  -  []  251.21 234.89 90 top
NOREF#493  -  []  139.08 203.76 0 top
NOREF#494  -  []  190.6 173.69 0 top
NOREF#495  -  []  249.49 220.89 0 top
NOREF#496  -  []  241.75 212.22 0 top
NOREF#497  -  []  192.87 248.11 90 top
NOREF#498  -  []  201.44 244.35 0 top
NOREF#499  -  []  271.19 283.92 0 top
NOREF#500  -  []  154.33 204.33 90 top
NOREF#501  -  []  175.84 262.57 90 top
NOREF#502  -  []  288.42 268.62 0 top
NOREF#503  -  []  289.52 270.32 90 top
NOREF#504  -  []  130.58 263.21 90 top
NOREF#505  -  []  181.55 267.14 90 top
NOREF#506  -  []  172.37 392.33 90 top
NOREF#507  -  []  283.97 210.55 90 top
NOREF#508  -  []  191.11 258.18 0 top
NOREF#509  -  []  199.72 274.65 90 top
NOREF#510  -  []  188.44 193.03 90 top
NOREF#511  -  []  279.72 279.22 90 top
NOREF#512  -  []  219.08 201.22 0 top
NOREF#513  -  []  264.26 456.29 90 top
NOREF#514  -  []  80.49 155.57 0 top
NOREF#515  -  []  148.32 182.05 0 top
NOREF#516  -  []  232.25 272.17 90 top
NOREF#517  -  []  260.95 204.09 90 top
NOREF#518  -  []  135.15 263.21 90 top
NOREF#519  -  []  227.99 238.35 0 top
NOREF#520  -  []  269.67 250.01 0 top
NOREF#521  -  []  134.51 263.76 0 top
NOREF#522  -  []  168.42 207.82 90 top
NOREF#523  -  []  195.17 272.17 0 top
NOREF#524  -  []  161.41 167.9 90 top
NOREF#525  -  []  214.04 210.63 90 top
NOREF#526  -  []  131.22 294.24 90 top
NOREF#527  -  []  208.54 204.45 90 top
NOREF#528  -  []  154.63 282.42 0 top
NOREF#529  -  []  234.07 191.6 90 top
NOREF#530  -  []  244.76 392.33 90 top
NOREF#531  -  []  127.04 239.09 0 top
NOREF#532  -  []  149.12 256.43 90 top
NOREF#533  -  []  171.25 244.35 0 top
NOREF#534  -  []  218.35 269.04 0 top
NOREF#535  -  []  237.04 244.35 0 top
NOREF#536  -  []  162.87 16.49 0 top
NOREF#537  -  []  239.4 204.45 90 top
NOREF#538  -  []  275.17 221.32 0 top
NOREF#539  -  []  168.54 205.9 0 top
NOREF#540  -  []  131.05 245.49 90 top
NOREF#541  -  []  276.57 198.18 0 top
NOREF#542  -  []  165.04 293.3 90 top
NOREF#543  -  []  197.59 175.77 0 top
NOREF#544  -  []  187.99 178.35 0 top
NOREF#545  -  []  187.8 269.99 0 top
NOREF#546  -  []  140.83 261.22 90 top
NOREF#547  -  []  245.04 293.3 90 top
NOREF#548  -  []  159.44 179.15 0 top
NOREF#549  -  []  191.79 251.93 0 top
NOREF#550  -  []  197.37 256.43 90 top
NOREF#551  -  []  159.22 190.88 90 top
NOREF#552  -  []  193.6 286.96 0 top
NOREF#553  -  []  283.84 201.77 0 top
NOREF#554  -  []  131.26 184.35 0 top
NOREF#555  -  []  155.05 278.82 0 top
NOREF#556  -  []  189.12 180.3 90 top
NOREF#557  -  []  273.27 193.35 0 top
NOREF#558  -  []  275.17 276.75 0 top
NOREF#559  -  []  239.24 244.35 0 top
NOREF#560  -  []  156.57 182.05 0 top
NOREF#561  -  []  164.61 294.89 90 top
NOREF#562  -  []  251.21 234.24 90 top
NOREF#563  -  []  231.11 200.17 90 top
NOREF#564  -  []  272.25 282.59 90 top
NOREF#565  -  []  197.92 190.01 0 top
NOREF#566  -  []  262.87 273.02 0 top
NOREF#567  -  []  218.95 266.12 0 top
NOREF#568  -  []  209.55 237.49 0 top
NOREF#569  -  []  256.55 220.49 0 top
NOREF#570  -  []  278.11 232.1 0 top
NOREF#571  -  []  254.09 200.42 90 top
NOREF#572  -  []  262.81 257.6 0 top
NOREF#573  -  []  237.74 226.35 90 top
NOREF#574  -  []  246.73 82.65 0 top
NOREF#575  -  []  133.64 239.09 0 top
NOREF#576  -  []  255.11 201.22 90 top
NOREF#577  -  []  161.75 214.76 0 top
NOREF#578  -  []  163.84 208.62 0 top
NOREF#579  -  []  237.5 245.31 90 top
NOREF#580  -  []  276.79 231.3 0 top
NOREF#581  -  []  293.99 17.15 0 top
NOREF#582  -  []  279.22 179.57 90 top
NOREF#583  -  []  188.32 242.05 0 top
NOREF#584  -  []  278.11 172.1 0 top
NOREF#585  -  []  237.37 240.3 90 top
NOREF#586  -  []  283.97 274.54 0 top
NOREF#587  -  []  137.28 286.47 0 top
NOREF#588  -  []  157.59 175.77 0 top
NOREF#589  -  []  146.17 286.14 90 top
NOREF#590  -  []  317.15 392.33 90 top
NOREF#591  -  []  276.1 211.85 90 top
NOREF#592  -  []  224.16 196.43 90 top
NOREF#593  -  []  151.98 220.75 90 top
NOREF#594  -  []  246.32 266.13 0 top
NOREF#595  -  []  178.35 207.01 0 top
NOREF#596  -  []  275.92 190.88 90 top
NOREF#597  -  []  268.99 196.75 0 top
NOREF#598  -  []  188.81 255.7 90 top
NOREF#599  -  []  236.7 253.03 90 top
NOREF#600  -  []  159.27 211.67 0 top
NOREF#601  -  []  262.81 186.81 0 top
NOREF#602  -  []  130.02 274.45 0 top
NOREF#603  -  []  191.91 191.6 90 top
NOREF#604  -  []  293.02 392.33 90 top
NOREF#605  -  []  266.01 250.88 90 top
NOREF#606  -  []  232.51 175.77 0 top
NOREF#607  -  []  148.44 197.85 90 top
NOREF#608  -  []  222.6 82.65 0 top
NOREF#609  -  []  187.45 269.24 0 top
NOREF#610  -  []  188.32 245.63 90 top
NOREF#611  -  []  196.57 198.18 0 top
NOREF#612  -  []  141.55 205.11 90 top
NOREF#613  -  []  203.84 201.77 0 top
NOREF#614  -  []  208.42 265.58 0 top
NOREF#615  -  []  146.28 257.85 90 top
NOREF#616  -  []  258.83 232.23 0 top
NOREF#617  -  []  236.61 173.37 90 top
NOREF#618  -  []  270.86 82.65 0 top
NOREF#619  -  []  157.71 173.69 90 top
NOREF#620  -  []  274.07 191.6 90 top
NOREF#621  -  []  235.17 276.75 0 top
NOREF#622  -  []  174.09 260.42 90 top
NOREF#623  -  []  129.49 266.31 0 top
NOREF#624  -  []  230.77 213.37 90 top
NOREF#625  -  []  210.89 269.17 0 top
NOREF#626  -  []  219.55 240.49 90 top
NOREF#627  -  []  237.03 238.07 0 top
NOREF#628  -  []  235.15 236.17 90 top
NOREF#629  -  []  152.11 171.4 0 top
NOREF#630  -  []  127.98 226.38 90 top
NOREF#631  -  []  272.87 188.11 90 top
NOREF#632  -  []  201.44 184.35 0 top
NOREF#633  -  []  241.75 266.13 0 top
NOREF#634  -  []  147.9 205.84 90 top
NOREF#635  -  []  237.04 184.35 0 top
NOREF#636  -  []  157.71 233.69 0 top
NOREF#637  -  []  273.39 257.85 90 top
NOREF#638  -  []  294.99 82.65 0 top
NOREF#639  -  []  246.32 202.32 0 top
NOREF#640  -  []  239.4 212 0 top
NOREF#641  -  []  151.91 196.43 90 top
NOREF#642  -  []  216.55 194.49 90 top
NOREF#643  -  []  288.54 267.5 90 top
NOREF#644  -  []  89.76 144.42 90 top
NOREF#645  -  []  247.95 226.12 90 top
NOREF#646  -  []  275.15 176.17 90 top
NOREF#647  -  []  248.54 207.5 90 top
NOREF#648  -  []  157.74 166.36 90 top
NOREF#649  -  []  231.18 239.15 0 top
NOREF#650  -  []  138.95 206.12 0 top
NOREF#651  -  []  173.34 17.15 0 top
NOREF#652  -  []  147.8 269.99 0 top
NOREF#653  -  []  211.25 184.35 0 top
NOREF#654  -  []  281.75 272.22 0 top
NOREF#655  -  []  166.32 209.17 0 top
NOREF#656  -  []  171.65 233.3 90 top
NOREF#657  -  []  187.8 205.39 90 top
NOREF#658  -  []  136.5 271.94 0 top
NOREF#659  -  []  152.25 218.02 90 top
NOREF#660  -  []  272.25 222.59 90 top
NOREF#661  -  []  269.84 219.54 90 top
NOREF#662  -  []  180.95 201.55 90 top
NOREF#663  -  []  275.17 221.32 90 top
NOREF#664  -  []  233.6 286.96 0 top
NOREF#665  -  []  233.18 222.26 90 top
NOREF#666  -  []  227.77 241.47 0 top
NOREF#667  -  []  151.53 173.37 90 top
NOREF#668  -  []  239.65 212.56 0 top
NOREF#669  -  []  153.18 282.26 90 top
NOREF#670  -  []  279.27 271.67 0 top
NOREF#671  -  []  269.84 273.7 90 top
NOREF#672  -  []  279.27 268.62 0 top
NOREF#673  -  []  131.22 234.24 90 top
NOREF#674  -  []  227.45 269.24 0 top
NOREF#675  -  []  159.27 207.82 90 top
NOREF#676  -  []  191.95 178.07 0 top
NOREF#677  -  []  202.2 178.35 0 top
NOREF#678  -  []  142.03 289.03 90 top
NOREF#679  -  []  151.46 167 0 top
NOREF#680  -  []  250.89 209.17 0 top
NOREF#681  -  []  246.32 212.22 0 top
NOREF#682  -  []  157.59 235.77 0 top
NOREF#683  -  []  270.77 283.79 90 top
NOREF#684  -  []  131.05 185.49 90 top
NOREF#685  -  []  219.72 273.6 90 top
NOREF#686  -  []  168.42 261.77 0 top
NOREF#687  -  []  290.89 202.32 0 top
NOREF#688  -  []  179.73 238.35 0 top
NOREF#689  -  []  148.99 196.75 0 top
NOREF#690  -  []  136.26 203.76 90 top
NOREF#691  -  []  223.36 187.38 0 top
NOREF#692  -  []  197.5 245.31 90 top
NOREF#693  -  []  237.59 175.77 0 top
NOREF#694  -  []  186.7 223.05 90 top
NOREF#695  -  []  14.6 372.12 0 top
NOREF#696  -  []  275.05 223.39 0 top
NOREF#697  -  []  241.41 167.9 90 top
NOREF#698  -  []  235.92 250.88 90 top
NOREF#699  -  []  235.58 262.67 90 top
NOREF#700  -  []  191.11 198.18 0 top
NOREF#701  -  []  190.97 195.7 90 top
NOREF#702  -  []  273.18 211.85 90 top
NOREF#703  -  []  234.39 216.17 90 top
NOREF#704  -  []  135.24 201.55 90 top
NOREF#705  -  []  277.37 251.6 90 top
NOREF#706  -  []  269.72 226.19 0 top
NOREF#707  -  []  149.72 221.62 0 top
NOREF#708  -  []  150.97 190.88 90 top
NOREF#709  -  []  143.36 258.18 0 top
NOREF#710  -  []  251.05 229.49 0 top
NOREF#711  -  []  236.81 232.54 0 top
NOREF#712  -  []  191.98 220.75 90 top
NOREF#713  -  []  153.03 172.1 0 top
NOREF#714  -  []  154.62 247.68 90 top
NOREF#715  -  []  159.4 202.09 0 top
NOREF#716  -  []  277.25 191.93 0 top
NOREF#717  -  []  161.75 269.17 0 top
NOREF#718  -  []  216 456.29 0 top
NOREF#719  -  []  211.25 244.35 0 top
NOREF#720  -  []  147.43 278.27 90 top
NOREF#721  -  []  196.57 185.63 90 top
NOREF#722  -  []  186.83 191.93 0 top
NOREF#723  -  []  144.16 245.63 90 top
NOREF#724  -  []  136.55 220.49 0 top
NOREF#725  -  []  156.1 211.85 90 top
NOREF#726  -  []  227.43 284.11 0 top
NOREF#727  -  []  264.24 18.69 0 top
NOREF#728  -  []  151.91 251.6 90 top
NOREF#729  -  []  152.61 456.29 0 top
NOREF#730  -  []  242.2 178.35 0 top
NOREF#731  -  []  181.6 308.11 0 top
NOREF#732  -  []  227.43 218.27 90 top
NOREF#733  -  []  249.52 264.23 90 top
NOREF#734  -  []  157.18 176.17 90 top
NOREF#735  -  []  154.39 216.17 90 top
NOREF#736  -  []  192.13 220.09 0 top
NOREF#737  -  []  275.15 236.17 90 top
NOREF#738  -  []  230.48 175.77 0 top
NOREF#739  -  []  249.49 280.89 0 top
NOREF#740  -  []  279.27 200.97 90 top
NOREF#741  -  []  156.7 241.72 90 top
NOREF#742  -  []  218.35 209.04 0 top
NOREF#743  -  []  233.94 256.75 0 top
NOREF#744  -  []  230.56 252.78 0 top
NOREF#745  -  []  88.44 106.3 90 top
NOREF#746  -  []  169.17 231.95 0 top
NOREF#747  -  []  203.84 213.41 90 top
NOREF#748  -  []  149.84 284.11 0 top
NOREF#749  -  []  243.84 214.21 0 top
NOREF#750  -  []  198.64 233.37 90 top
NOREF#751  -  []  150.88 228.6 90 top
NOREF#752  -  []  192.72 252.78 0 top
NOREF#753  -  []  148.32 245.63 90 top
NOREF#754  -  []  168.42 208.62 0 top
NOREF#755  -  []  277.04 184.35 0 top
NOREF#756  -  []  195.17 216.75 90 top
NOREF#757  -  []  236.52 276.55 0 top
NOREF#758  -  []  147.43 218.27 0 top
NOREF#759  -  []  148.35 217.95 90 top
NOREF#760  -  []  299.62 18.69 90 top
NOREF#761  -  []  147.77 192.78 0 top
NOREF#762  -  []  169.52 270.32 90 top
NOREF#763  -  []  106.83 127.87 90 top
NOREF#764  -  []  187.03 231.4 0 top
NOREF#765  -  []  272.25 282.59 0 top
NOREF#766  -  []  248.42 204.78 90 top
NOREF#767  -  []  239.06 178.07 0 top
NOREF#768  -  []  196.57 253.35 0 top
NOREF#769  -  []  195.49 168.7 90 top
NOREF#770  -  []  147.8 264.99 90 top
NOREF#771  -  []  266.96 256.43 90 top
NOREF#772  -  []  276.57 253.35 0 top
NOREF#773  -  []  229.84 273.7 0 top
NOREF#774  -  []  248.54 265.9 0 top
NOREF#775  -  []  193.98 238.07 0 top
NOREF#776  -  []  138.35 207.01 0 top
NOREF#777  -  []  227.03 171.4 0 top
NOREF#778  -  []  273.39 253.03 90 top
NOREF#779  -  []  209.52 267.27 90 top
NOREF#780  -  []  233.6 222.39 0 top
NOREF#781  -  []  213.62 289.09 90 top
NOREF#782  -  []  276.61 173.37 90 top
NOREF#783  -  []  243.97 214.54 0 top
NOREF#784  -  []  171.22 294.24 90 top
NOREF#785  -  []  195.92 250.88 90 top
NOREF#786  -  []  193.39 193.03 90 top
NOREF#787  -  []  209.52 204.23 90 top
NOREF#788  -  []  156.02 248.11 90 top
NOREF#789  -  []  138.35 204.47 0 top
NOREF#790  -  []  146.17 272.17 90 top
NOREF#791  -  []  192.25 222.59 90 top
NOREF#792  -  []  284.95 267.27 90 top
NOREF#793  -  []  254.09 260.42 90 top
NOREF#794  -  []  239.27 271.67 0 top
NOREF#795  -  []  174.38 204.09 0 top
NOREF#796  -  []  196.84 167.33 0 top
NOREF#797  -  []  165.38 286.23 0 top
NOREF#798  -  []  231.53 173.37 90 top
NOREF#799  -  []  233.27 198.18 0 top
NOREF#800  -  []  95.35 456.29 0 top
NOREF#801  -  []  218.97 211.91 90 top
NOREF#802  -  []  275.17 276.75 90 top
NOREF#803  -  []  150.77 273.37 90 top
NOREF#804  -  []  147.51 252.5 90 top
NOREF#805  -  []  170.89 266.13 0 top
NOREF#806  -  []  254.33 389.27 90 top
NOREF#807  -  []  198.11 172.1 0 top
NOREF#808  -  []  180.83 261.22 90 top
NOREF#809  -  []  163.92 229.94 0 top
NOREF#810  -  []  196.38 241.15 90 top
NOREF#811  -  []  191.53 173.37 90 top
NOREF#812  -  []  187.43 278.27 90 top
NOREF#813  -  []  186.83 196.75 0 top
NOREF#814  -  []  228.32 245.63 0 top
NOREF#815  -  []  224.16 256.43 90 top
NOREF#816  -  []  233.39 257.85 90 top
NOREF#817  -  []  276.57 193.35 0 top
NOREF#818  -  []  182.81 246.81 0 top
NOREF#819  -  []  163.84 205.58 0 top
NOREF#820  -  []  199.27 268.62 0 top
NOREF#821  -  []  191.18 239.15 0 top
NOREF#822  -  []  281.75 202.32 0 top
NOREF#823  -  []  132.26 248.4 0 top
NOREF#824  -  []  163.84 270.87 90 top
NOREF#825  -  []  260.95 206.12 90 top
NOREF#826  -  []  196.45 187.71 0 top
NOREF#827  -  []  236.57 245.63 0 top
NOREF#828  -  []  208.42 207.82 90 top
NOREF#829  -  []  189.72 275.77 0 top
NOREF#830  -  []  178.83 232.23 0 top
NOREF#831  -  []  280.23 236.17 90 top
NOREF#832  -  []  153.18 184.35 0 top
NOREF#833  -  []  209.87 389.27 90 top
NOREF#834  -  []  151.73 232.54 0 top
NOREF#835  -  []  221.59 294.14 0 top
NOREF#836  -  []  157.04 244.35 0 top
NOREF#837  -  []  279.27 264.78 90 top
NOREF#838  -  []  244.95 260.42 90 top
NOREF#839  -  []  194.07 196.43 90 top
NOREF#840  -  []  214.07 210.89 90 top
NOREF#841  -  []  213.65 239.15 0 top
NOREF#842  -  []  188.35 223.79 90 top
NOREF#843  -  []  271.46 227 0 top
NOREF#844  -  []  180.83 268.59 90 top
NOREF#845  -  []  163.84 264.78 90 top
NOREF#846  -  []  221.55 269.94 90 top
NOREF#847  -  []  164.64 181.15 90 top
NOREF#848  -  []  214.43 232.23 0 top
NOREF#849  -  []  182.81 252.78 0 top
NOREF#850  -  []  144.04 191.93 0 top
NOREF#851  -  []  268.78 228.49 0 top
NOREF#852  -  []  243.97 208.95 0 top
NOREF#853  -  []  225.61 192.78 0 top
NOREF#854  -  []  188.44 253.03 90 top
NOREF#855  -  []  192.63 173.69 90 top
NOREF#856  -  []  230.77 279.22 90 top
NOREF#857  -  []  266.96 191.6 90 top
NOREF#858  -  []  273.18 222.26 90 top
NOREF#859  -  []  155.68 233.69 90 top
NOREF#860  -  []  142.81 192.78 0 top
NOREF#861  -  []  185.61 252.78 0 top
NOREF#862  -  []  191.79 191.93 0 top
NOREF#863  -  []  272.51 175.77 0 top
NOREF#864  -  []  194.07 251.6 90 top
NOREF#865  -  []  152.87 188.11 90 top
NOREF#866  -  []  255.24 201.55 90 top
NOREF#867  -  []  255.84 262.57 90 top
NOREF#868  -  []  218.95 201.55 0 top
NOREF#869  -  []  209.55 237.49 0 top
NOREF#870  -  []  195.17 216.75 0 top
NOREF#871  -  []  261.85 232.5 0 top
NOREF#872  -  []  194.39 276.17 90 top
NOREF#873  -  []  275.49 228.7 90 top
NOREF#874  -  []  236.38 241.15 90 top
NOREF#875  -  []  212.87 227.4 90 top
NOREF#876  -  []  215.11 201.22 90 top
NOREF#877  -  []  243.84 270.87 90 top
NOREF#878  -  []  195.17 281.32 0 top
NOREF#879  -  []  191.87 456.29 0 top
NOREF#880  -  []  209.52 272.86 90 top
NOREF#881  -  []  196.52 276.55 0 top
NOREF#882  -  []  181.55 207.14 90 top
NOREF#883  -  []  272.13 280.09 0 top
NOREF#884  -  []  211.25 244.35 0 top
NOREF#885  -  []  161.75 266.13 0 top
NOREF#886  -  []  219.55 294.49 0 top
NOREF#887  -  []  275.17 216.75 90 top
NOREF#888  -  []  201.41 167.9 90 top
NOREF#889  -  []  191.73 172.54 0 top
NOREF#890  -  []  139.55 234.49 0 top
NOREF#891  -  []  230.6 173.69 90 top
NOREF#892  -  []  192.51 235.77 0 top
NOREF#893  -  []  231.19 218.07 0 top
NOREF#894  -  []  159.24 184.35 0 top
NOREF#895  -  []  217.29 247.78 0 top
NOREF#896  -  []  269.84 219.54 0 top
NOREF#897  -  []  271.95 238.07 0 top
NOREF#898  -  []  271.11 193.35 0 top
NOREF#899  -  []  138.83 292.23 0 top
NOREF#900  -  []  273.83 172.21 90 top
NOREF#901  -  []  223.49 257.85 90 top
NOREF#902  -  []  223.89 245.24 90 top
NOREF#903  -  []  189.55 188.99 90 top
NOREF#904  -  []  203.97 260.64 90 top
NOREF#905  -  []  226.83 251.93 0 top
NOREF#906  -  []  199.27 270.87 90 top
NOREF#907  -  []  239.4 210.55 90 top
NOREF#908  -  []  270.41 168.7 90 top
NOREF#909  -  []  232.87 188.11 90 top
NOREF#910  -  []  266.28 257.85 90 top
NOREF#911  -  []  157.5 185.31 90 top
NOREF#912  -  []  168.54 260.64 90 top
NOREF#913  -  []  268.99 240.62 0 top
NOREF#914  -  []  155.17 212.18 0 top
NOREF#915  -  []  163.84 201.77 0 top
NOREF#916  -  []  149.84 279.54 0 top
NOREF#917  -  []  157.04 184.35 0 top
NOREF#918  -  []  270.88 168.6 90 top
NOREF#919  -  []  235.26 83.81 0 top
NOREF#920  -  []  277.03 178.07 0 top
NOREF#921  -  []  279.44 239.15 0 top
NOREF#922  -  []  220.83 265.79 90 top
NOREF#923  -  []  246.32 206.13 0 top
NOREF#924  -  []  190.77 219.22 90 top
NOREF#925  -  []  279.27 273.41 90 top
NOREF#926  -  []  192.66 226.35 90 top
NOREF#927  -  []  214.09 200.42 90 top
NOREF#928  -  []  260.83 265.79 90 top
NOREF#929  -  []  218.95 204.09 0 top
NOREF#930  -  []  188.44 181.72 90 top
NOREF#931  -  []  276.7 257.85 90 top
NOREF#932  -  []  199.72 283.79 90 top
NOREF#933  -  []  229.72 221.62 0 top
NOREF#934  -  []  131.65 233.3 90 top
NOREF#935  -  []  266.43 296.46 90 top
NOREF#936  -  []  122.85 281.02 0 top
NOREF#937  -  []  135.66 244.35 0 top
NOREF#938  -  []  156.45 187.71 0 top
NOREF#939  -  []  233.18 244.35 0 top
NOREF#940  -  []  153.39 193.03 90 top
NOREF#941  -  []  119.48 456.29 0 top
NOREF#942  -  []  147.03 231.4 0 top
NOREF#943  -  []  174.51 263.76 0 top
NOREF#944  -  []  241.12 248.11 90 top
NOREF#945  -  []  210.02 214.45 0 top
NOREF#946  -  []  218.85 241.15 90 top
NOREF#947  -  []  153.6 222.39 0 top
NOREF#948  -  []  235.05 223.39 0 top
NOREF#949  -  []  147.99 178.35 0 top
NOREF#950  -  []  88.16 165.19 0 top
NOREF#951  -  []  270.77 273.37 90 top
NOREF#952  -  []  255.65 184.35 0 top
NOREF#953  -  []  189.12 196.43 90 top
NOREF#954  -  []  269.12 191.6 90 top
NOREF#955  -  []  237.37 196.43 90 top
NOREF#956  -  []  213.24 261.55 0 top
NOREF#957  -  []  227.8 265.39 90 top
NOREF#958  -  []  274.07 251.6 90 top
NOREF#959  -  []  122.2 178.35 0 top
NOREF#960  -  []  195.15 176.17 90 top
NOREF#961  -  []  233.56 233.37 90 top
NOREF#962  -  []  244.95 200.42 90 top
NOREF#963  -  []  252.55 284.49 0 top
NOREF#964  -  []  189.12 256.43 90 top
NOREF#965  -  []  228.78 222.65 0 top
NOREF#966  -  []  179.72 273.6 90 top
NOREF#967  -  []  145.09 257.49 90 top
NOREF#968  -  []  283.84 200.97 90 top
NOREF#969  -  []  227.43 278.27 90 top
NOREF#970  -  []  150.15 266.89 90 top
NOREF#971  -  []  195.15 236.17 90 top
NOREF#972  -  []  259.72 213.6 90 top
NOREF#973  -  []  155.05 218.82 0 top
NOREF#974  -  []  203.84 200.97 90 top
NOREF#975  -  []  267.77 181.47 0 top
NOREF#976  -  []  271.19 218.07 0 top
NOREF#977  -  []  223.36 258.18 0 top
NOREF#978  -  []  159.4 270.55 90 top
NOREF#979  -  []  170.89 269.17 0 top
NOREF#980  -  []  255.02 268.14 90 top
NOREF#981  -  []  268.35 217.95 90 top
NOREF#982  -  []  93.68 156.59 0 top
NOREF#983  -  []  270.6 233.69 0 top
NOREF#984  -  []  226.28 193.03 90 top
NOREF#985  -  []  229.55 248.99 90 top
NOREF#986  -  []  288.39 452.29 90 top
NOREF#987  -  []  279.72 274.65 90 top
NOREF#988  -  []  230.56 197.6 0 top
NOREF#989  -  []  191.11 260.17 90 top
NOREF#990  -  []  249.17 291.95 0 top
NOREF#991  -  []  156.79 231.3 0 top
NOREF#992  -  []  239.4 270.55 90 top
NOREF#993  -  []  178.95 266.12 0 top
NOREF#994  -  []  253.62 229.09 90 top
NOREF#995  -  []  159.4 208.95 0 top
NOREF#996  -  []  230.97 179.57 90 top
NOREF#997  -  []  203.84 267.82 90 top
NOREF#998  -  []  202.85 297.22 0 top
NOREF#999  -  []  236.02 257.6 0 top
NOREF#1000  -  []  193.56 233.37 90 top
NOREF#1001  -  []  229.84 273.7 90 top
NOREF#1002  -  []  190.48 175.77 0 top
NOREF#1003  -  []  243.97 202.09 0 top
NOREF#1004  -  []  153.18 217.69 90 top
NOREF#1005  -  []  143.36 253.35 0 top
NOREF#1006  -  []  283.97 267.5 90 top
NOREF#1007  -  []  203.84 211.67 0 top
NOREF#1008  -  []  276.33 167.9 90 top
NOREF#1009  -  []  273.18 282.26 90 top
NOREF#1010  -  []  271.98 226.59 90 top
NOREF#1011  -  []  147.51 250.88 90 top
NOREF#1012  -  []  189.84 224.11 0 top
NOREF#1013  -  []  151.79 251.93 0 top
NOREF#1014  -  []  273.18 277.69 90 top
NOREF#1015  -  []  276.8 220.49 90 top
NOREF#1016  -  []  210.89 262.32 0 top
NOREF#1017  -  []  124.61 234.24 90 top
NOREF#1018  -  []  226.7 223.05 90 top
NOREF#1019  -  []  209.55 237.49 0 top
NOREF#1020  -  []  153.95 251.93 0 top
NOREF#1021  -  []  85.59 155.57 90 top
NOREF#1022  -  []  151.71 171.3 0 top
NOREF#1023  -  []  197.37 240.3 90 top
NOREF#1024  -  []  148.32 198.18 0 top
NOREF#1025  -  []  233.6 276.55 0 top
NOREF#1026  -  []  114.55 316.49 0 top
NOREF#1027  -  []  235.05 283.39 0 top
NOREF#1028  -  []  233.94 196.75 0 top
NOREF#1029  -  []  216.55 220.49 0 top
NOREF#1030  -  []  213.45 244.35 0 top
NOREF#1031  -  []  153.27 193.35 0 top
NOREF#1032  -  []  199.06 178.07 0 top
NOREF#1033  -  []  196.54 227 0 top
NOREF#1034  -  []  179.08 265.79 0 top
NOREF#1035  -  []  267.8 205.39 90 top
NOREF#1036  -  []  288.42 207.82 90 top
NOREF#1037  -  []  134.07 210.89 90 top
NOREF#1038  -  []  229.12 191.6 90 top
NOREF#1039  -  []  279.4 270.55 90 top
NOREF#1040  -  []  269.24 185.31 90 top
NOREF#1041  -  []  150.77 223.79 90 top
NOREF#1042  -  []  222.81 192.78 0 top
NOREF#1043  -  []  199.4 272 0 top
NOREF#1044  -  []  155.17 281.32 90 top
NOREF#1045  -  []  147.43 224.11 90 top
NOREF#1046  -  []  241.44 244.35 0 top
NOREF#1047  -  []  125.25 291.4 90 top
NOREF#1048  -  []  149.84 273.7 0 top
NOREF#1049  -  []  158.11 232.1 0 top
NOREF#1050  -  []  194.33 207.37 90 top
NOREF#1051  -  []  286.32 212.22 0 top
NOREF#1052  -  []  289.52 264.23 90 top
NOREF#1053  -  []  163.97 208.95 0 top
NOREF#1054  -  []  152.13 220.09 0 top
NOREF#1055  -  []  235.96 228.6 90 top
NOREF#1056  -  []  300.14 320.9 0 top
NOREF#1057  -  []  228.99 251.93 0 top
NOREF#1058  -  []  156.57 258.18 0 top
NOREF#1059  -  []  190.56 252.78 0 top
NOREF#1060  -  []  192.25 218.02 90 top
NOREF#1061  -  []  271.46 167 0 top
NOREF#1062  -  []  124.61 294.24 90 top
NOREF#1063  -  []  268.89 392.33 90 top
NOREF#1064  -  []  163.97 214.54 0 top
NOREF#1065  -  []  268.78 184.35 0 top
NOREF#1066  -  []  259.08 208.59 0 top
NOREF#1067  -  []  149.84 224.11 0 top
NOREF#1068  -  []  214.38 204.09 0 top
NOREF#1069  -  []  219.08 205.79 0 top
NOREF#1070  -  []  151.95 178.07 0 top
NOREF#1071  -  []  209.49 280.89 0 top
NOREF#1072  -  []  228.44 253.03 90 top
NOREF#1073  -  []  236.54 167 0 top
NOREF#1074  -  []  236.57 258.18 0 top
NOREF#1075  -  []  151.79 256.75 0 top
NOREF#1076  -  []  210.89 209.17 0 top
NOREF#1077  -  []  262.03 289.03 90 top
NOREF#1078  -  []  159.27 204.78 90 top
NOREF#1079  -  []  140.95 264.09 90 top
NOREF#1080  -  []  134.43 292.23 0 top
NOREF#1081  -  []  283.84 261.77 0 top
NOREF#1082  -  []  179.73 238.35 0 top
NOREF#1083  -  []  213.75 452.29 90 top
NOREF#1084  -  []  280.23 176.17 90 top
NOREF#1085  -  []  211.25 184.35 0 top
NOREF#1086  -  []  235.17 281.32 90 top
NOREF#1087  -  []  187.99 238.35 0 top
NOREF#1088  -  []  237.25 251.93 0 top
NOREF#1089  -  []  242.44 292.28 0 top
NOREF#1090  -  []  230.88 228.6 90 top
NOREF#1091  -  []  228.35 223.79 90 top
NOREF#1092  -  []  164.95 264.23 90 top
NOREF#1093  -  []  244.61 234.89 90 top
NOREF#1094  -  []  226.16 226.14 90 top
NOREF#1095  -  []  243.84 268.62 0 top
NOREF#1096  -  []  264.04 196.75 0 top
NOREF#1097  -  []  226.43 236.47 90 top
NOREF#1098  -  []  169.05 292.28 0 top
NOREF#1099  -  []  142.03 229.03 90 top
NOREF#1100  -  []  279.4 268.95 0 top
NOREF#1101  -  []  195.17 272.17 90 top
NOREF#1102  -  []  177.25 176.5 90 top
NOREF#1103  -  []  174.43 292.23 0 top
